# Altium PCB Breakout_PCB-v1.0.PcbDoc
Units mil, origin at the board's own origin, x right, y up, seen from the top; angles counter-clockwise.
Board outline 3543.31 x 5118.11 mil, 2 copper layers (Top Layer, Bottom Layer), stack 61.811 mil thick; 16 components, 15 nets, 128 pads, 0 vias.
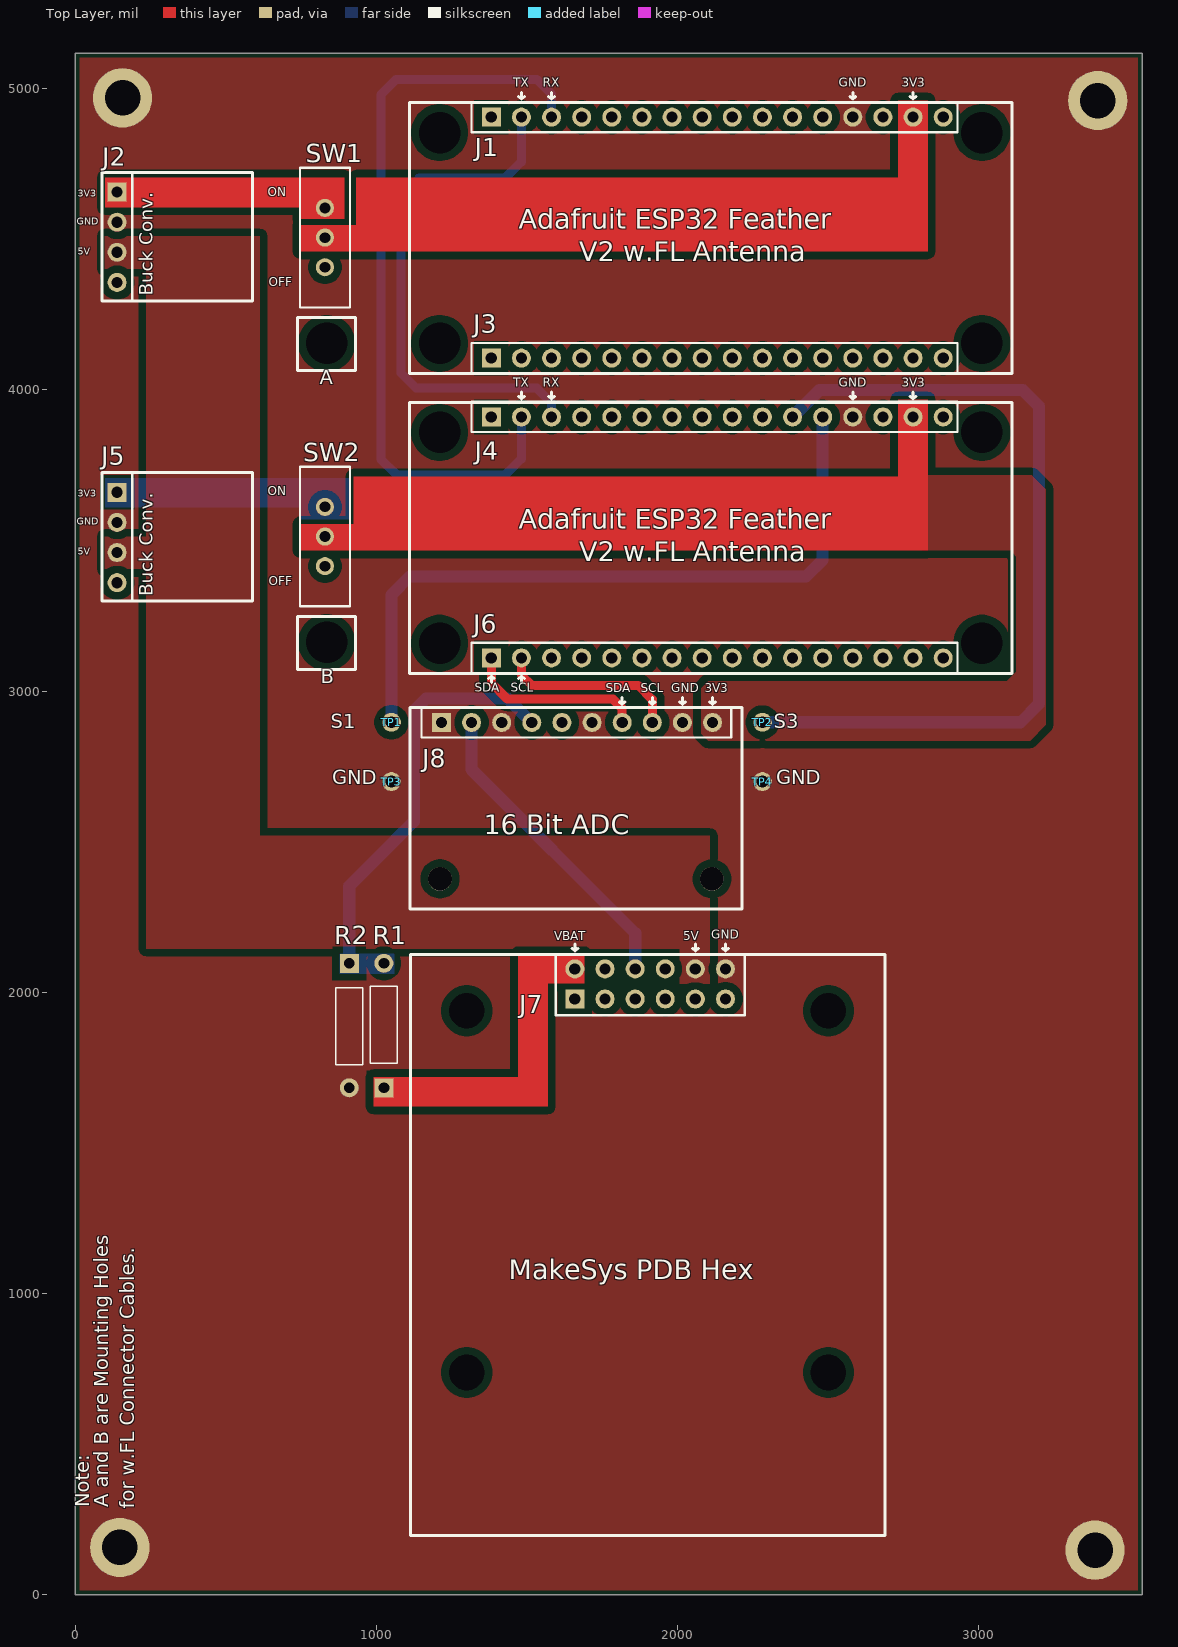
[diagram p0: Top Layer view]
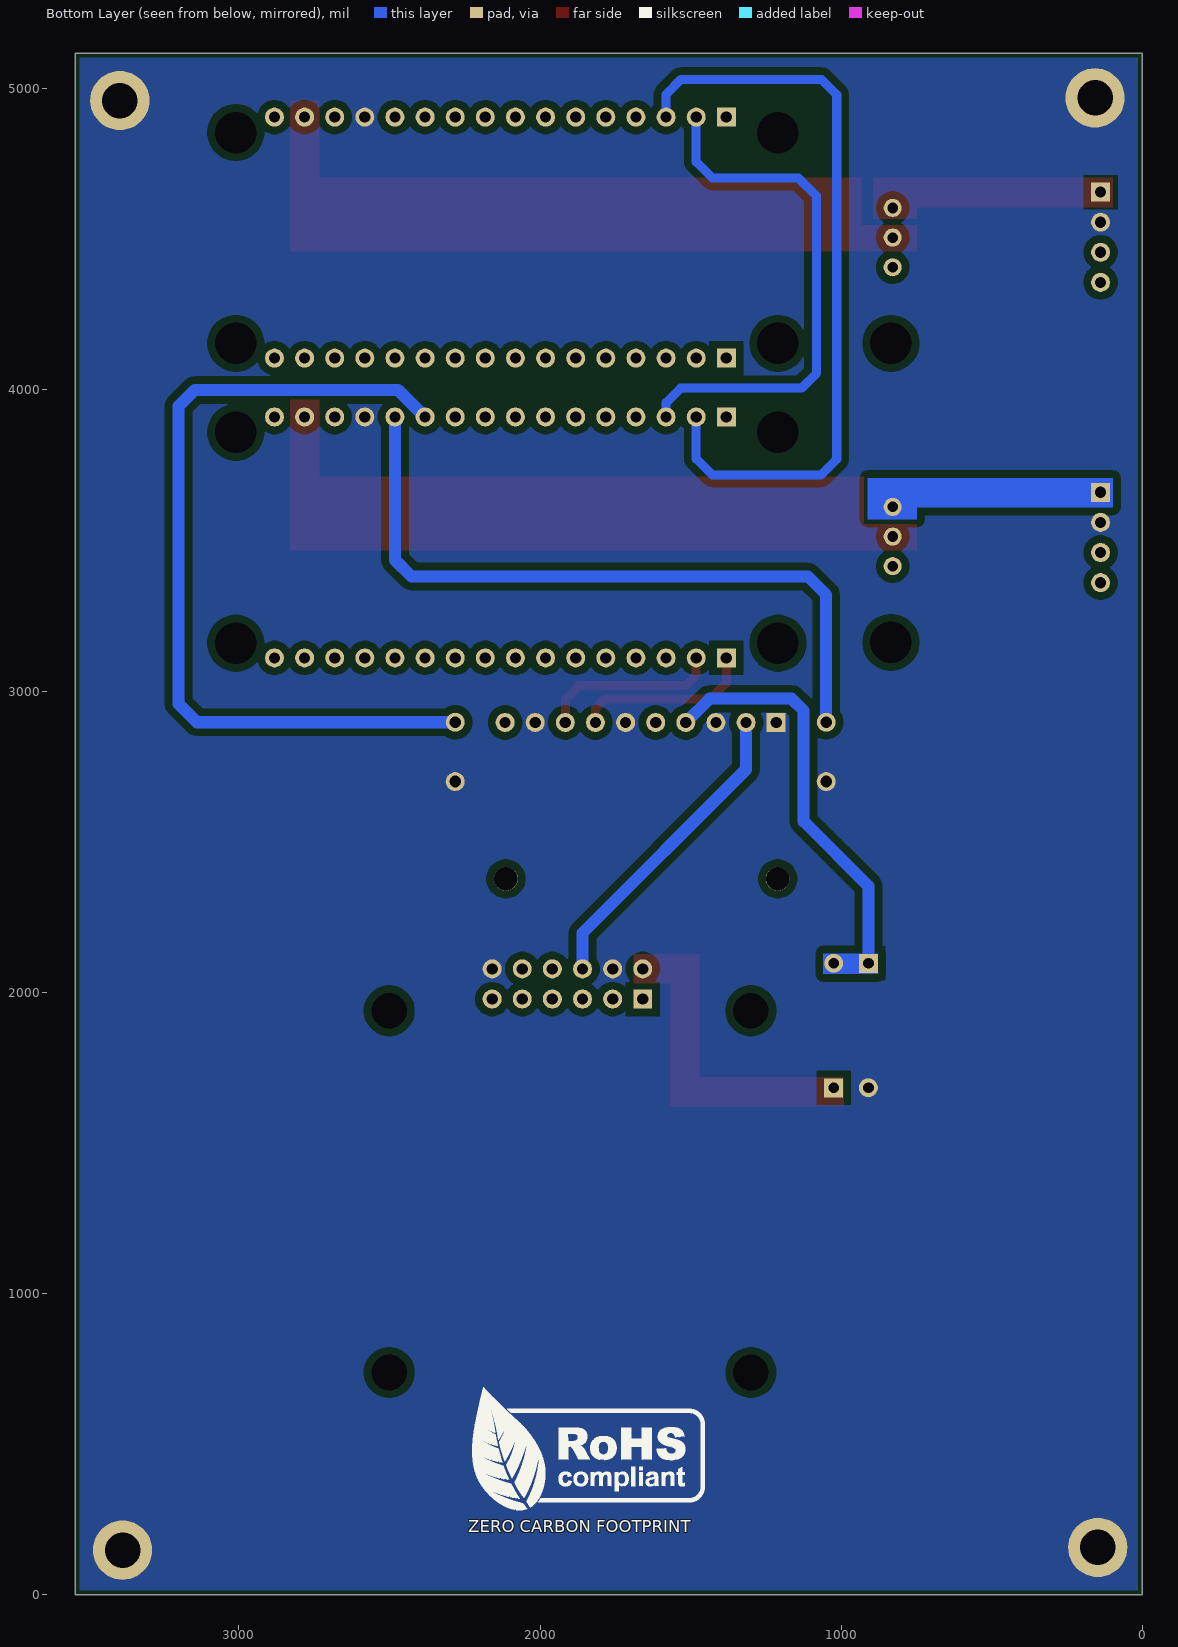
[diagram p1: Bottom Layer view, seen from below]
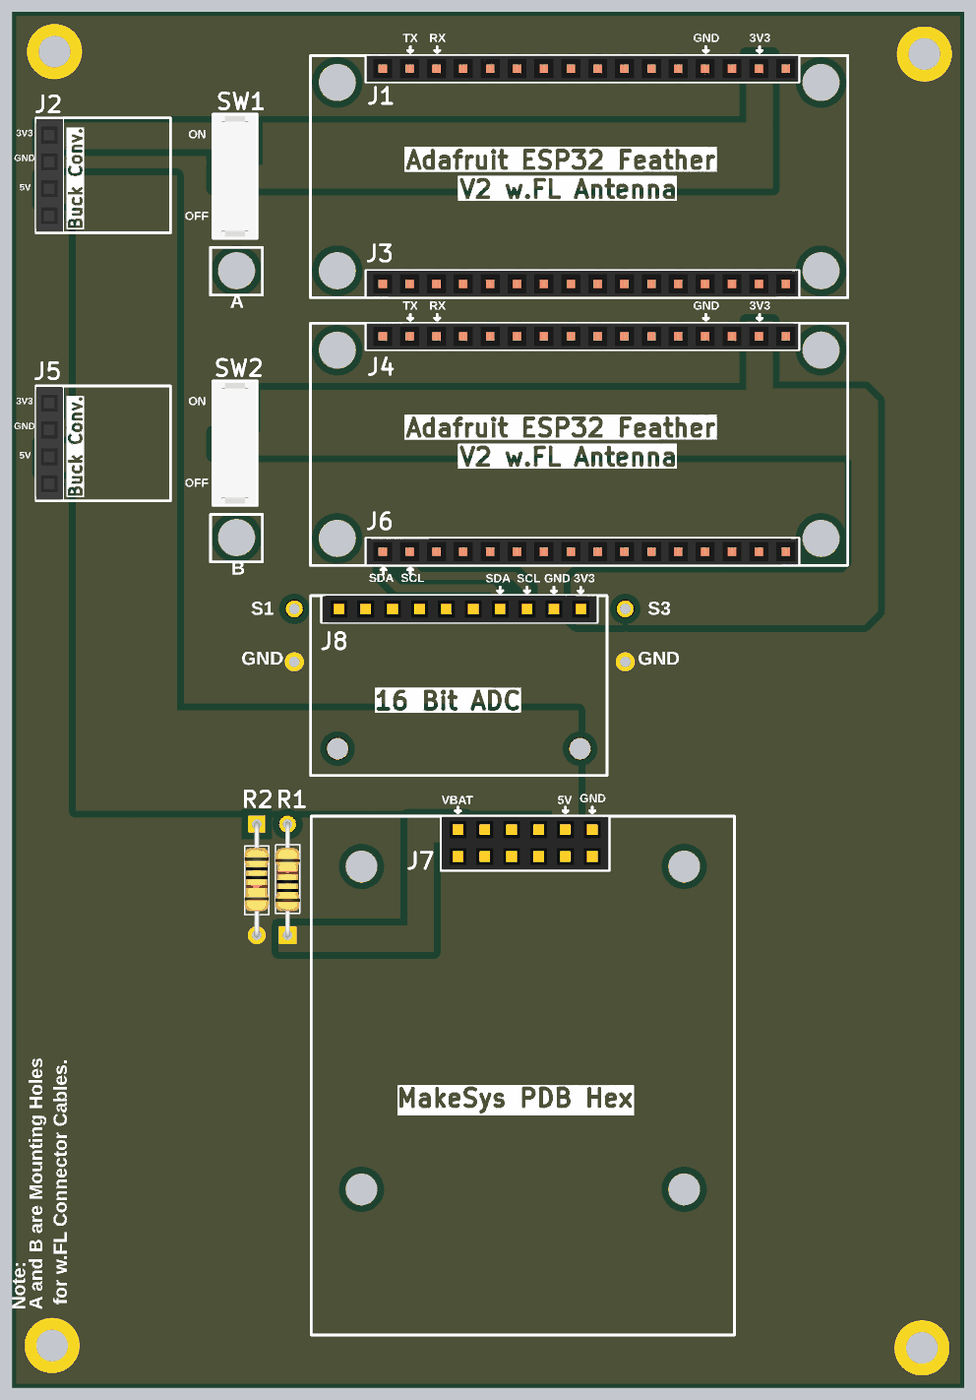
[diagram p2: 3D render of the assembled board from above, using the file's embedded part models]

## Layer stack, top to bottom
Top Solder: solder mask 0.3937, Solder Resist, Dk 3.5
Top Layer: signal copper 1.378
Dielectric 1: core 59.0551, FR-4, Dk 4.8
Bottom Layer: signal copper 1.378
Bottom Solder: solder mask 0.3937, Solder Resist, Dk 3.5

## Board outline
0,0 0,5118.11 3543.31,5118.11 3543.31,0

## Design rules (kind name [scope] priority, off if disabled: settings)
BoardOutlineClearance [All] p1: gap=15 ignorepadtopadclearanceinfootprint=FALSE except(0: Text-OutlineEdge Text-CavityEdge Text-CutoutEdge Text-SplitBarrior Text-SplitContinuation)
Clearance [All] p1: gap=15 ignorepadtopadclearanceinfootprint=FALSE except(25: Arc-Poly Track-Poly SMDPad-Poly THPad-Poly Via-Poly Fill-Poly Poly-Poly)
HoleSize [All] p1: absolutevalues=TRUE maxlimit=137.8 minlimit=1 maxpercent=80.000 minpercent=20.000
PolygonConnect [All] p1: connectstyle=Direct reliefconductorwidth=10 reliefentries=4 polygonreliefangle="90 Angle" airgapwidth=10
RoutingVias [All] p1: holewidth=11.81 width=23.62 viastyle="Through Hole" minholewidth=11.81 minwidth=23.62 maxholewidth=11.81 maxwidth=23.62
SilkToSilkClearance [All] p1: silktosilkclearance=0
SilkToSolderMaskClearance [IsPad] p1: minsilkscreentomaskgap=0 clearancetoexposedcopper=TRUE
SolderMaskExpansion [All] p1: expansion=4 istentingtop=FALSE
UnRoutedNet [All] p1: checkbadconnections=TRUE
Width [All] p1: maxlimit=60 minlimit=10 preferedwidth=20 minimp=50.000000 maximp=50.000000 favimp=50.000000
26 further rules are at their usual default settings.

## Components (designator, comment, footprint, x,y, rotation, side; value= is the part's Value field where it differs from the comment)
J1 "2685Y-116CNG1SNA01" "HDR1X16 Female" 2131.61,4905.78 r0 top locked
J2 "C2718488" "HDR1X4 Female" 139.17,4507 r270 top locked
J3 "2685Y-116CNG1SNA01" "HDR1X16 Female" 2131.61,4105.78 r0 top locked
J4 "2685Y-116CNG1SNA01" "HDR1X16 Female" 2131.61,3910.26 r0 top locked
J5 "C2718488" "HDR1X4 Female" 139.17,3510.33 r270 top locked
J6 "2685Y-116CNG1SNA01" "HDR1X16 Female" 2131.61,3110.26 r0 top locked
J7 "PM254V-12-12-H85" "HDR2X6 FEMALE" 1909,2028 r0 top
J8 "X6511FV-10-C85D32" "HDR1X10 Female" 1666,2896.07 r0 top
R1 "1/4 watt Resistor" "1/4 WATT RESISTOR" 1025,1890 r90 top
R2 "1/4 watt Resistor" "1/4 WATT RESISTOR" 910,1890 r270 top
SW1 "EG1218" EG1218 829.29,4505.78 r270 top locked
SW2 "EG1218" EG1218 829.29,3513.33 r270 top locked
TP1 "0.1mm Test Pad" "0.1mm Test Pad" 1050,2896.85 r0 top
TP2 "0.1mm Test Pad" "0.1mm Test Pad" 2281.61,2896.85 r0 top
TP3 "0.1mm Test Pad" "0.1mm Test Pad" 1050,2700 r0 top
TP4 "0.1mm Test Pad" "0.1mm Test Pad" 2281.61,2700 r0 top

## Footprints (in the part's own frame and the unit in brackets; to place one, negate y for a bottom-side part, rotate by r counter-clockwise, add the part's x,y. Pads: shape width x height; smd on the part's side, far side on the other; paste and mask are expansions set on the pad)
"0.1mm Test Pad" [mm]
  round 1.6 hole 1: 1(0,0)
"1/4 WATT RESISTOR" [mm]
  rect 1.6x1.6 hole 0.914 paste+0 mask+0.051: 1(-5.25,0)
  round 1.6 hole 0.914 paste+0 mask+0.051: 2(5.25,0)
  silkscreen extent -3.18,-1.14 3.3,1.14, body extent -5.48,-1.15 5.47,1.15, height 3.91
EG1218 [mil]
  round 60 hole 35.43: 1(-98.43,0) 2(0,0) 3(98.43,0)
  silkscreen extent -232,-83 232,83, body extent -228,-79 228,79, height 276
"HDR1X4 Female" [mm]
  rect 1.6x1.6 hole 0.95: 1(-3.81,0)
  round 1.6 hole 0.95: 2(-1.27,0) 3(1.27,0) 4(3.81,0)
  silkscreen extent -5.49,-1.27 5.36,1.27, body extent -5.38,-1.3 5.28,1.24, height 8.5
"HDR1X10 Female" [mm]
  rect 1.6x1.6 hole 0.95: 1(-11.43,0)
  round 1.6 hole 0.95: 2(-8.89,0) 3(-6.35,0) 4(-3.81,0) 5(-1.27,0) 6(1.27,0) 7(3.81,0) 8(6.35,0) 9(8.89,0) 10(11.43,0)
  silkscreen extent -13.11,-1.27 13,1.27, body extent -12.95,-1.27 12.95,1.27, height 8.5
"HDR1X16 Female" [mm]
  rect 1.6x1.6 hole 0.95: 1(-19.05,0)
  round 1.6 hole 0.95: 2(-16.51,0) 3(-13.97,0) 4(-11.43,0) 5(-8.89,0) 6(-6.35,0) 7(-3.81,0) 8(-1.27,0) 9(1.27,0) 10(3.81,0) 11(6.35,0) 12(8.89,0) 13(11.43,0) 14(13.97,0) 15(16.51,0) 16(19.05,0)
  silkscreen extent -20.73,-1.27 20.26,1.27, body extent -20.64,-1.24 20.16,1.24, height 8.61
"HDR2X6 FEMALE" [mm]
  rect 1.6x1.6 hole 0.95: 1(-6.35,-1.27)
  round 1.6 hole 0.95: 2(-6.35,1.27) 3(-3.81,-1.27) 4(-3.81,1.27) 5(-1.27,-1.27) 6(-1.27,1.27) 7(1.27,-1.27) 8(1.27,1.27) 9(3.81,-1.27) 10(3.81,1.27) 11(6.35,-1.27) 12(6.35,1.27)
  silkscreen extent -7.98,-2.64 7.98,2.5, body extent -7.87,-2.56 7.87,2.44, height 8.5

## Part data
J1 J3 J4 J6: "2.54mm Plugin 16P Brass Straight 1x16P Plugin,P=2.54mm Female Headers ROHS", LCSC Part Number=C350305, Manufacturer=HOAUC, Package=Plugin,P=2.54mm, ComponentLink1Description=LCSC, ComponentLink1URL=https://www.lcsc.com/product-detail/Female-Headers_HOAUC-2685Y-116CNG1SNA01_C350305.html, Item Type=Header, Manufacturer Part Number=2685Y-116CNG1SNA01
J2 J5: "2.54mm Plugin 3A bronze -40℃~+105℃ Straight 1x4P Top 4 Square Holes Plugin,P=2.54mm Female Headers ROHS", Manufacturer=BOOMELE, Package=Plugin,P=2.54mm, ComponentLink1Description=LCSC, ComponentLink1URL=https://www.lcsc.com/product-detail/Female-Headers_BOOMELE-Boom-Precision-Elec-C2718488_C2718488.html, Item Type=Header, LCSC Part Number=C2718488, Manufacturer Part Number=C2718488
J7: "2.54mm 2.54mm 双排 12P Brass Straight 2x6P Plugin,P=2.54mm Female Headers ROHS", LCSC Part Number=C541855, Manufacturer=XFCN, Package=Plugin,P=2.54mm, ComponentLink1Description=LCSC, ComponentLink1URL=https://www.lcsc.com/product-detail/Female-Headers_XFCN-PM254V-12-12-H85_C541855.html, Item Type=Header, Manufacturer Part Number=PM254V-12-12-H85
J8: "2.54mm Plugin Gold 3A 10P Brass -40℃~+105℃ 250V 260℃ Straight 1x10P 8.5mm Top Square Holes Plugin,P=2.54mm Female Headers ROHS", LCSC Part Number=C718235, Manufacturer="XKB Connectivity", Package=Plugin,P=2.54mm, ComponentLink1Description=LCSC, ComponentLink1URL=https://www.lcsc.com/product-detail/Female-Headers_XKB-Connectivity-X6511FV-10-C85D32_C718235.html, Item Type=Header, Manufacturer Part Number=X6511FV-10-C85D32
SW1 SW2: "Switch Slide N.O./N.C. SPDT Top Slide 0.2A 30VDC PC Pins Thru-Hole", Contact Current Rating=200mA, Contact Resistance=20mR, Insulation Resistance=100R, LCSC Part Number=C273394, Manufacturer=E-Switch, Max Operating Temperature=70°C, Min Operating Temperature=-20°C, Operating Force=250gf, Supplier Part Number 1=EG1903-ND, Voltage Rating=30V, Actuator Length=2mm, Actuator Type=Standard, Category="Slide Switches", ComponentLink1Description=https://datasheet.ciiva.com/1699/p040040c-1699451.pdf?src-supplier=Newark, ComponentLink1URL=https://datasheet.ciiva.com/1699/p040040c-1699451.pdf?src-supplier=Newark, Contact Material="Copper Alloy,Copper,Silver", Contact Plating=Silver, Electrical Life=10000Cycles, Illumination Type=Non-Illuminated, Lead Free="Lead Free", Manufacturer Part Number=EG1218, Mount="Through Hole", Number of Pins=3, Number of Positions=2, Orientation=Straight, Packaging=Bulk, Pricing 1="1=0.76, 10=0.727, 25=0.6996, 100=0.6071, 250=0.55396, 500=0.51478, 1000=0.46162, 2500=0.43364, 5000=0.40287 (USD)", Reach SVHC Compliant=No, RoHS=Yes, RoHS Compliant=Yes, Series=EG, Stock 1=57148, Supplier 1=Digi-Key, Switch Function=On-On, Switch Travel=2.5mm, Termination="PC Pin", Throw Configuration=SPDT, Voltage Rating (AC)=30V, Voltage Rating (DC)=30V
TP1 TP2 TP3 TP4: "Test pad"

## Free pads (board coordinates)
  round 0 hole 137.8: 2(835,3162.2) 2(835,4154.65) 2(1210.07,3159.13) 2(1210.07,3859.13) 2(1210.07,4154.65) 2(1210.07,4854.65) 2(3010.07,3159.13) 2(3010.07,3859.13) 2(3010.07,4154.65) 2(3010.07,4854.65)
  round 0 hole 118.11: 2(1300.01,738.2) 2(1300.01,1938.99) 2(2500.8,738.2) 2(2500.8,1938.99)
  round 78.74 hole 78.74: MH(1210.99,2376.97) MH(2113.35,2376.97)
  round 196.85 hole 118.11: MH1(148.48,157.48) MH1(157.48,4969.63) MH1(3385.83,148.48) MH1(3394.82,4960.63)

## Nets (pads, with @x,y where several pads share a name; then routed paths per layer and width w, separated by ;. In a path a pad name is that pad's centre, name@x,y a point inside that pad or via, vN(x,y) a via of type N, cw(c..) or ccw(c..) an arc to the next point about the centre after c; other vN are vias at no path point)
3V3: J4.15 J8.10 SW2.2 | length 1004.4
  Top Layer w40: 1789.34,3511.17 2766.31,3511.17 2781.43,3496.05 2781.43,3490
3V3#: J1.15 SW1.2
3V3_BUCK: J5.1 SW2.1
3V3_BUCK#: J2.1 SW1.1
5V: J2.3 J5.3 J7.10
A0: J8.4 R1.2 R2.1 | length 1482.6
  Bottom Layer w40: R1.2 R2.1 910,2353 1125,2568 1125,2935 1165,2975 1437.07,2975 J8.4
CURRENT_SHUNT: J7.6 J8.2 | length 1043.2
  Bottom Layer w40: J8.2 1316,2740 1859.45,2196.55 J7.6@1859.45,2078
GND: J1.13 J2.2 J4.13 J5.2 J7.4 J7.12 J8.1 J8.3 J8.6 J8.9 pad.MH1 R2.2 TP3.1 TP4.1
RX: J1.3 J4.2 | length 2542.9
  Bottom Layer w30: J4.2 1481.61,3771.61 1428,3718 1067,3718 1015,3770 1015,4980 1066,5031 1531.97,5031 1581.61,4981.36 J1.3
S1: J4.12 TP1.1 | length 2377.3
  Bottom Layer w40: TP1.1 1050,3320 1111,3381 2427,3381 2481.61,3435.61 J4.12
S3: J4.11 TP2.1 | length 2809.6
  Bottom Layer w40: TP2.1 3138.85,2896.85 3200,2958 3200,3946 3146,4000 2471.35,4000 J4.11
SCL: J6.2 J8.8 | length 600.9
  Top Layer w30: J6.2 1481.61,3053.39 1516,3019 1869,3019 1916,2972 J8.8
SDA: J6.1 J8.7 | length 599.1
  Top Layer w30: J6.1 1381.61,3027.39 1435,2974 1785,2974 1815.37,2943.63 1815.37,2896.69 J8.7
TX: J1.2 J4.3 | length 1769.8
  Bottom Layer w30: J1.2 1481.61,4757.61 1427,4703 1142,4703 1082,4643 1082,4056 1132,4006 1533,4006 1581.09,3957.91 1581.09,3910.79 J4.3
VBAT: J7.2 R1.1
pads on no net: J1.1 J1.4 J1.5 J1.6 J1.7 J1.8 J1.9 J1.10 J1.11 J1.12 J1.14 J1.16 J2.4 J3.1 J3.2 J3.3 J3.4 J3.5 J3.6 J3.7 J3.8 J3.9 J3.10 J3.11 J3.12 J3.13 J3.14 J3.15 J3.16 J4.1 J4.4 J4.5 J4.6 J4.7 J4.8 J4.9 J4.10 J4.14 J4.16 J5.4 J6.3 J6.4 J6.5 J6.6 J6.7 J6.8 J6.9 J6.10 J6.11 J6.12 J6.13 J6.14 J6.15 J6.16 J7.1 J7.3 J7.5 J7.7 J7.8 J7.9 J7.11 J8.5 SW1.3 SW2.3

## Polygon pours and split planes (outlines as drawn)
GND on Top Layer "Bottom Layer-GND" (solid, remove dead copper, pour order 1): 0,0 0,5114.65 3545.28,5114.65 3545.28,0
3V3 on Top Layer "NONET_L-01_P-001" (solid, pour order 3): 2814,3717 2814,3468 3105.26,3468 3124,3445.75 3124,3065 3092,3033 2102,3033 2078,3009 2078,2884 2078,2859 2101,2836 3170,2836 3222,2888 3222,3671 3176,3717
5V on Top Layer "5V_L01_P002" (solid, remove dead copper, pour order 2): 2107,2028 2007.87,2028 2007.87,2145.67 236.22,2145.67 236.22,3406 98.43,3406 98.43,3512.33 236,3512.33 236,4403 98.43,4403 98.43,4510 613,4510 613,2519.69 2107,2519.69
GND on Bottom Layer "Bottom Layer-GND" (solid, remove dead copper, pour order 0): 0,0 0,5114.65 3545.28,5114.65 3545.28,0

## Other copper
Top Layer:
  region net VBAT: 1490,2127.39 1490,2028.97 1690.5,2028.97 1690.5,2127.39
  region net VBAT: 990.8,1719.39 990.8,1620.97 1569.03,1620.97 1569.03,1719.39
  rectangle net VBAT: 1470.61,1635.27 1569.03,2127.39
  rectangle net 3V3: 748.03,3467.55 2830.65,3554.79
  rectangle net 3V3: 2732.22,3476.05 2830.65,3968.18
  rectangle net 3V3: 923.84,3476.05 2830.65,3712.27
  rectangle net 3V3#: 933,4468.5 2830.65,4704.72
  rectangle net 3V3#: 2732.22,4468.5 2830.65,4960.63
  rectangle net 3V3#: 748.03,4460 2830.65,4547.24
  rectangle net 3V3_BUCK#: 748.03,4566.93 894,4704.72
  rectangle net 3V3_BUCK#: 98.43,4606.3 885.83,4704.72
  pour cut-out: 1698.5,2131.5 1818,2131.5 1818,2005 1698.5,2005
Bottom Layer:
  rectangle net A0: 878,2061 1060,2129
  rectangle net 3V3_BUCK: 98.43,3609.63 885.83,3708.05
  rectangle net 3V3_BUCK: 748.03,3570.26 912.29,3708.05

## Silkscreen, mask and mechanical layers (free items; w line width, h text height)
Top Overlay:
  lines w10: 1372,3042.04 1381.61,3050.26 ; 1381.61,3028.01 1381.61,3050.26 ; 1391.23,3042.04 1381.61,3050.26 ; 1472,3042.04 1481.61,3050.26 ; 1472,3978.48 1481.61,3970.26 ; 1472,4974 1481.61,4965.78 ; 1481.61,3028.01 1481.61,3050.26 ; 1481.61,3992.51 1481.61,3970.26 ; 1481.61,4988.03 1481.61,4965.78 ; 1491.23,3042.04 1481.61,3050.26 ; 1491.23,3978.48 1481.61,3970.26 ; 1491.23,4974 1481.61,4965.78 ; 1572,3978.48 1581.61,3970.26 ; 1572,4974 1581.61,4965.78 ; 1581.61,3992.51 1581.61,3970.26 ; 1581.61,4988.03 1581.61,4965.78 ; 1591.23,3978.48 1581.61,3970.26 ; 1591.23,4974 1581.61,4965.78 ; 1649.39,2146.22 1659,2138 ; 1659,2160.25 1659,2138 ; 1668.61,2146.22 1659,2138 ; 1806.39,2964.29 1816,2956.07 ; 1816,2978.32 1816,2956.07 ; 1825.61,2964.29 1816,2956.07 ; 1906.39,2964.29 1916,2956.07 ; 1916,2978.32 1916,2956.07 ; 1925.61,2964.29 1916,2956.07 ; 2006.39,2964.29 2016,2956.07 ; 2016,2978.32 2016,2956.07 ; 2025.61,2964.29 2016,2956.07 ; 2049.39,2146.22 2059,2138 ; 2059,2160.25 2059,2138 ; 2068.61,2146.22 2059,2138 ; 2106.39,2964.29 2116,2956.07 ; 2116,2978.32 2116,2956.07 ; 2125.61,2964.29 2116,2956.07 ; 2149.39,2146.22 2159,2138 ; 2159,2160.25 2159,2138 ; 2168.61,2146.22 2159,2138 ; 2572,3978.48 2581.61,3970.26 ; 2572,4974 2581.61,4965.78 ; 2581.61,3992.51 2581.61,3970.26 ; 2581.61,4988.03 2581.61,4965.78 ; 2591.23,3978.48 2581.61,3970.26 ; 2591.23,4974 2581.61,4965.78 ; 2772,3978.48 2781.61,3970.26 ; 2772,4974 2781.61,4965.78 ; 2781.61,3992.51 2781.61,3970.26 ; 2781.61,4988.03 2781.61,4965.78 ; 2791.23,3978.48 2781.61,3970.26 ; 2791.23,4974 2781.61,4965.78 ; 89,3299 589,3299 589,3726 89,3726 89,3299 ; 89,4295.67 589,4295.67 589,4722.67 89,4722.67 89,4295.67 ; 738,3071.55 931,3071.55 931,3248.55 738,3248.55 738,3071.55 ; 738,4064 931,4064 931,4241 738,4241 738,4064 ; 1110.07,3059.13 3110.07,3059.13 3110.07,3959.13 1110.07,3959.13 1110.07,3059.13 ; 1110.07,4054.65 3110.07,4054.65 3110.07,4954.65 1110.07,4954.65 1110.07,4054.65 ; 1110.99,2276.97 1110.99,2946.26 2213.35,2946.26 2213.35,2276.97 1110.99,2276.97 ; 1113,196.87 2687.8,196.87 2687.8,2126 1113,2126 1113,196.87
  text "TX" at 1453.62,4996.19 h50
  text "RX" at 1552.28,4996.19 h50
  text "GND" at 2534.17,4996.19 h50
  text "3V3" at 2743.66,4996.4 h50
  text "3V3" at 8,4633.03 h40
  text "ON" at 640,4633.41 h50
  text "GND" at 5,4540.39 h40
  text "Adafruit ESP32 Feather" at 1473.14,4535.03 h65
  text "5V" at 8,4440.63 h40
  text "V2 w.FL Antenna" at 1673.32,4427.03 h65
  text "OFF" at 642.33,4334.22 h50
  text "Buck Conv." at 257.49,4312.49 h45 r90
  text "A" at 811.32,4002.4 h80
  text "TX" at 1453.62,4000.67 h50
  text "RX" at 1552.28,4000.67 h50
  text "GND" at 2534.17,4000.67 h50
  text "3V3" at 2743.66,4000.88 h50
  text "ON" at 640,3640.96 h50
  text "3V3" at 8,3636.36 h40
  text "GND" at 5,3543.72 h40
  text "Adafruit ESP32 Feather" at 1473.14,3539.51 h65
  text "5V" at 8,3443.96 h40
  text "V2 w.FL Antenna" at 1673.32,3431.51 h65
  text "OFF" at 642.33,3341.77 h50
  text "Buck Conv." at 257.49,3315.82 h45 r90
  text "B" at 815.58,3009.95 h80
  text "SDA" at 1327.34,2987.87 h50
  text "SCL" at 1446.39,2987.87 h50
  text "3V3" at 2090.05,2986.69 h50
  text "SDA" at 1761.73,2986.48 h50
  text "SCL" at 1877.78,2986.48 h50
  text "GND" at 1979.55,2986.48 h50
  text "S1" at 849,2860.28 h80
  text "S3" at 2319,2860.28 h80
  text "GND" at 853.1,2674.4 h80
  text "GND" at 2328.1,2674.4 h80
  text "16 Bit ADC" at 1357.18,2524.51 h65
  text "GND" at 2111.55,2168.41 h50
  text "VBAT" at 1591.16,2163.08 h50
  text "5V" at 2018,2163.08 h50
  text "MakeSys PDB Hex" at 1439.49,1047.34 h65
  text "Note:" at 63.2,290.72 h80 r90
  text "A and B are Mounting Holes" at 127.06,290.48 h80 r90
  text "for w.FL Connector Cables." at 212.55,285.57 h80 r90
Bottom Overlay:
  drawing of 16 lines, arcs and shapes, not listed
  text "ZERO CARBON FOOTPRINT" at 2239.02,207.18 h40
Board Outline:
  lines w5: 3545.28,0 3545.28,5118.11
  lines w10: 0,0 3543.31,0 3543.31,5118.11 0,5118.11 0,0
Fabrication:
  drawing of 191 lines, arcs and shapes, not listed
  text "Layer" at 4329.2,2875 h60
  text "Name" at 4739.11,2875 h60
  text "Material" at 5668.85,2875 h60
  text "Thickness" at 6528.62,2875 h60
  text "Constant" at 7178.46,2875 h60
  text "Board Layer Stack" at 7748.32,2875 h60
  text "Top Overlay" at 4739.11,2755 h60
  text "Top Solder" at 4739.11,2635 h60
  text "Solder Resist" at 5668.85,2635 h60
  text "0.39mil" at 6528.62,2635 h60
  text "3.5" at 7178.46,2635 h60
  text "1" at 4329.2,2515 h60
  text "Top Layer" at 4739.11,2515 h60
  text "1.38mil" at 6528.62,2515 h60
  text "Dielectric 1" at 4739.11,2395 h60
  text "FR-4" at 5668.85,2395 h60
  text "59.06mil" at 6528.62,2395 h60
  text "4.8" at 7178.46,2395 h60
  text "2" at 4329.2,2275 h60
  text "Bottom Layer" at 4739.11,2275 h60
  text "1.38mil" at 6528.62,2275 h60
  text "Bottom Solder" at 4739.11,2155 h60
  text "Solder Resist" at 5668.85,2155 h60
  text "0.39mil" at 6528.62,2155 h60
  text "3.5" at 7178.46,2155 h60
  text "Bottom Overlay" at 4739.11,2035 h60
  text "Total board thickness:" at 4329.2,1915 h60
  text "62.60mil" at 6528.62,1915 h60
Drill Drawing:
  circle w10: c4297.06,4498.33 r33.33
  lines w10: 4263.73,3631.66 4330.4,3631.66 4297.06,3564.99 4263.73,3631.66 ; 4263.73,3731.66 4280.4,3731.66 4297.06,3714.99 4313.73,3731.66 4330.4,3731.66 4313.73,3748.33 4330.4,3764.99 4313.73,3764.99 4297.06,3781.66 4280.4,3764.99 4263.73,3764.99 4280.4,3748.33 4263.73,3731.66 ; 4263.73,3864.99 4297.06,3881.66 4330.4,3864.99 4313.73,3898.33 4330.4,3931.66 4297.06,3914.99 4263.73,3931.66 4280.4,3898.33 4263.73,3864.99 ; 4263.73,4031.66 4280.4,4031.66 4280.4,4014.99 4313.73,4014.99 4313.73,4031.66 4330.4,4031.66 4330.4,4064.99 4313.73,4064.99 4313.73,4081.66 4280.4,4081.66 4280.4,4064.99 4263.73,4064.99 4263.73,4031.66 ; 4263.73,4164.99 4330.4,4164.99 4330.4,4231.66 4263.73,4231.66 4263.73,4164.99 ; 4263.73,4314.99 4263.73,4331.66 4280.4,4348.33 4263.73,4364.99 4263.73,4381.66 4280.4,4381.66 4297.06,4364.99 4313.73,4381.66 4330.4,4381.66 4330.4,4364.99 4313.73,4348.33 4330.4,4331.66 4330.4,4314.99 4313.73,4314.99 4297.06,4331.66 4280.4,4314.99 4263.73,4314.99
  lines w15: 4203.94,3519.99 11264.03,3519.99 ; 4203.94,4569.99 11264.03,4569.99 ; 4754.81,3369.99 4754.81,4719.99 ; 5344.66,3369.99 5344.66,4719.99 ; 6494.32,3369.99 6494.32,4719.99 ; 7000.2,3369.99 7000.2,4719.99 ; 7734,3369.99 7734,4719.99 ; 9233.55,3369.99 9233.55,4719.99 ; 9823.4,3369.99 9823.4,4719.99 ; 10569.2,3369.99 10569.2,4719.99 ; 4203.94,3369.99 11264.03,3369.99 11264.03,4719.99 4203.94,4719.99 4203.94,3369.99
  text "Symbol" at 4293.94,4614.99 h72
  text "Count" at 4799.81,4614.99 h72
  text "Hole Size" at 5389.66,4614.99 h72
  text "Plated" at 6539.32,4614.99 h72
  text "Hole Type" at 7045.2,4614.99 h72
  text "Drill Layer Pair" at 7779,4614.99 h72
  text "Via/Pad" at 9278.55,4614.99 h72
  text "Pad Shape" at 9868.4,4614.99 h72
  text "Template" at 10614.2,4614.99 h72
  text "6" at 4799.81,4464.99 h60
  text "35.43mil (0.900mm)" at 5389.66,4464.99 h60
  text "PTH" at 6539.32,4464.99 h60
  text "Round" at 7045.2,4464.99 h60
  text "Top Layer - Bottom Layer" at 7779,4464.99 h60
  text "Pad" at 9278.55,4464.99 h60
  text "Rounded" at 9868.4,4464.99 h60
  text "c152h90" at 10614.2,4464.99 h60
  text "4" at 4799.81,4314.99 h60
  text "36.00mil (0.914mm)" at 5389.66,4314.99 h60
  text "PTH" at 6539.32,4314.99 h60
  text "Round" at 7045.2,4314.99 h60
  text "Top Layer - Bottom Layer" at 7779,4314.99 h60
  text "Pad" at 9278.55,4314.99 h60
  text "(Mixed)" at 9868.4,4314.99 h60
  text "(Mixed)" at 10614.2,4314.99 h60
  text "94" at 4799.81,4164.99 h60
  text "37.40mil (0.950mm)" at 5389.66,4164.99 h60
  text "PTH" at 6539.32,4164.99 h60
  text "Round" at 7045.2,4164.99 h60
  text "Top Layer - Bottom Layer" at 7779,4164.99 h60
  text "Pad" at 9278.55,4164.99 h60
  text "(Mixed)" at 9868.4,4164.99 h60
  text "(Mixed)" at 10614.2,4164.99 h60
  text "4" at 4799.81,4014.99 h60
  text "39.37mil (1.000mm)" at 5389.66,4014.99 h60
  text "PTH" at 6539.32,4014.99 h60
  text "Round" at 7045.2,4014.99 h60
  text "Top Layer - Bottom Layer" at 7779,4014.99 h60
  text "Pad" at 9278.55,4014.99 h60
  text "Rounded" at 9868.4,4014.99 h60
  text "c160h100" at 10614.2,4014.99 h60
  text "2" at 4799.81,3864.99 h60
  text "78.74mil (2.000mm)" at 5389.66,3864.99 h60
  text "PTH" at 6539.32,3864.99 h60
  text "Round" at 7045.2,3864.99 h60
  text "Top Layer - Bottom Layer" at 7779,3864.99 h60
  text "Pad" at 9278.55,3864.99 h60
  text "Rounded" at 9868.4,3864.99 h60
  text "c200h200" at 10614.2,3864.99 h60
  text "8" at 4799.81,3714.99 h60
  text "118.11mil (3.000mm)" at 5389.66,3714.99 h60
  text "PTH" at 6539.32,3714.99 h60
  text "Round" at 7045.2,3714.99 h60
  text "Top Layer - Bottom Layer" at 7779,3714.99 h60
  text "Pad" at 9278.55,3714.99 h60
  text "Rounded" at 9868.4,3714.99 h60
  text "(Mixed)" at 10614.2,3714.99 h60
  text "10" at 4799.81,3564.99 h60
  text "137.79mil (3.500mm)" at 5389.66,3564.99 h60
  text "PTH" at 6539.32,3564.99 h60
  text "Round" at 7045.2,3564.99 h60
  text "Top Layer - Bottom Layer" at 7779,3564.99 h60
  text "Pad" at 9278.55,3564.99 h60
  text "Rounded" at 9868.4,3564.99 h60
  text "c0h350" at 10614.2,3564.99 h60
  text "128 Total" at 4799.81,3414.99 h60

## Dimensions
1050,2896.85 to 1050,2700 on Dimensions
3543.31,5118.11 to 3543.31,0 on Dimensions
3543.31,5118.11 to 0,5118.11 on Dimensions